# Altium PCB IoT_Speaker-PCB-v2.1.PcbDoc (part 3 of 3)
Units mm, origin at the board's own origin, x right, y up, seen from the top; angles counter-clockwise.
Board outline 61.96 x 67.79 mm, 2 copper layers (Top Layer, Bottom Layer), stack 1.57 mm thick; 110 components, 59 nets, 362 pads, 125 vias.
Unrouted connection lines stored in the file: 99.
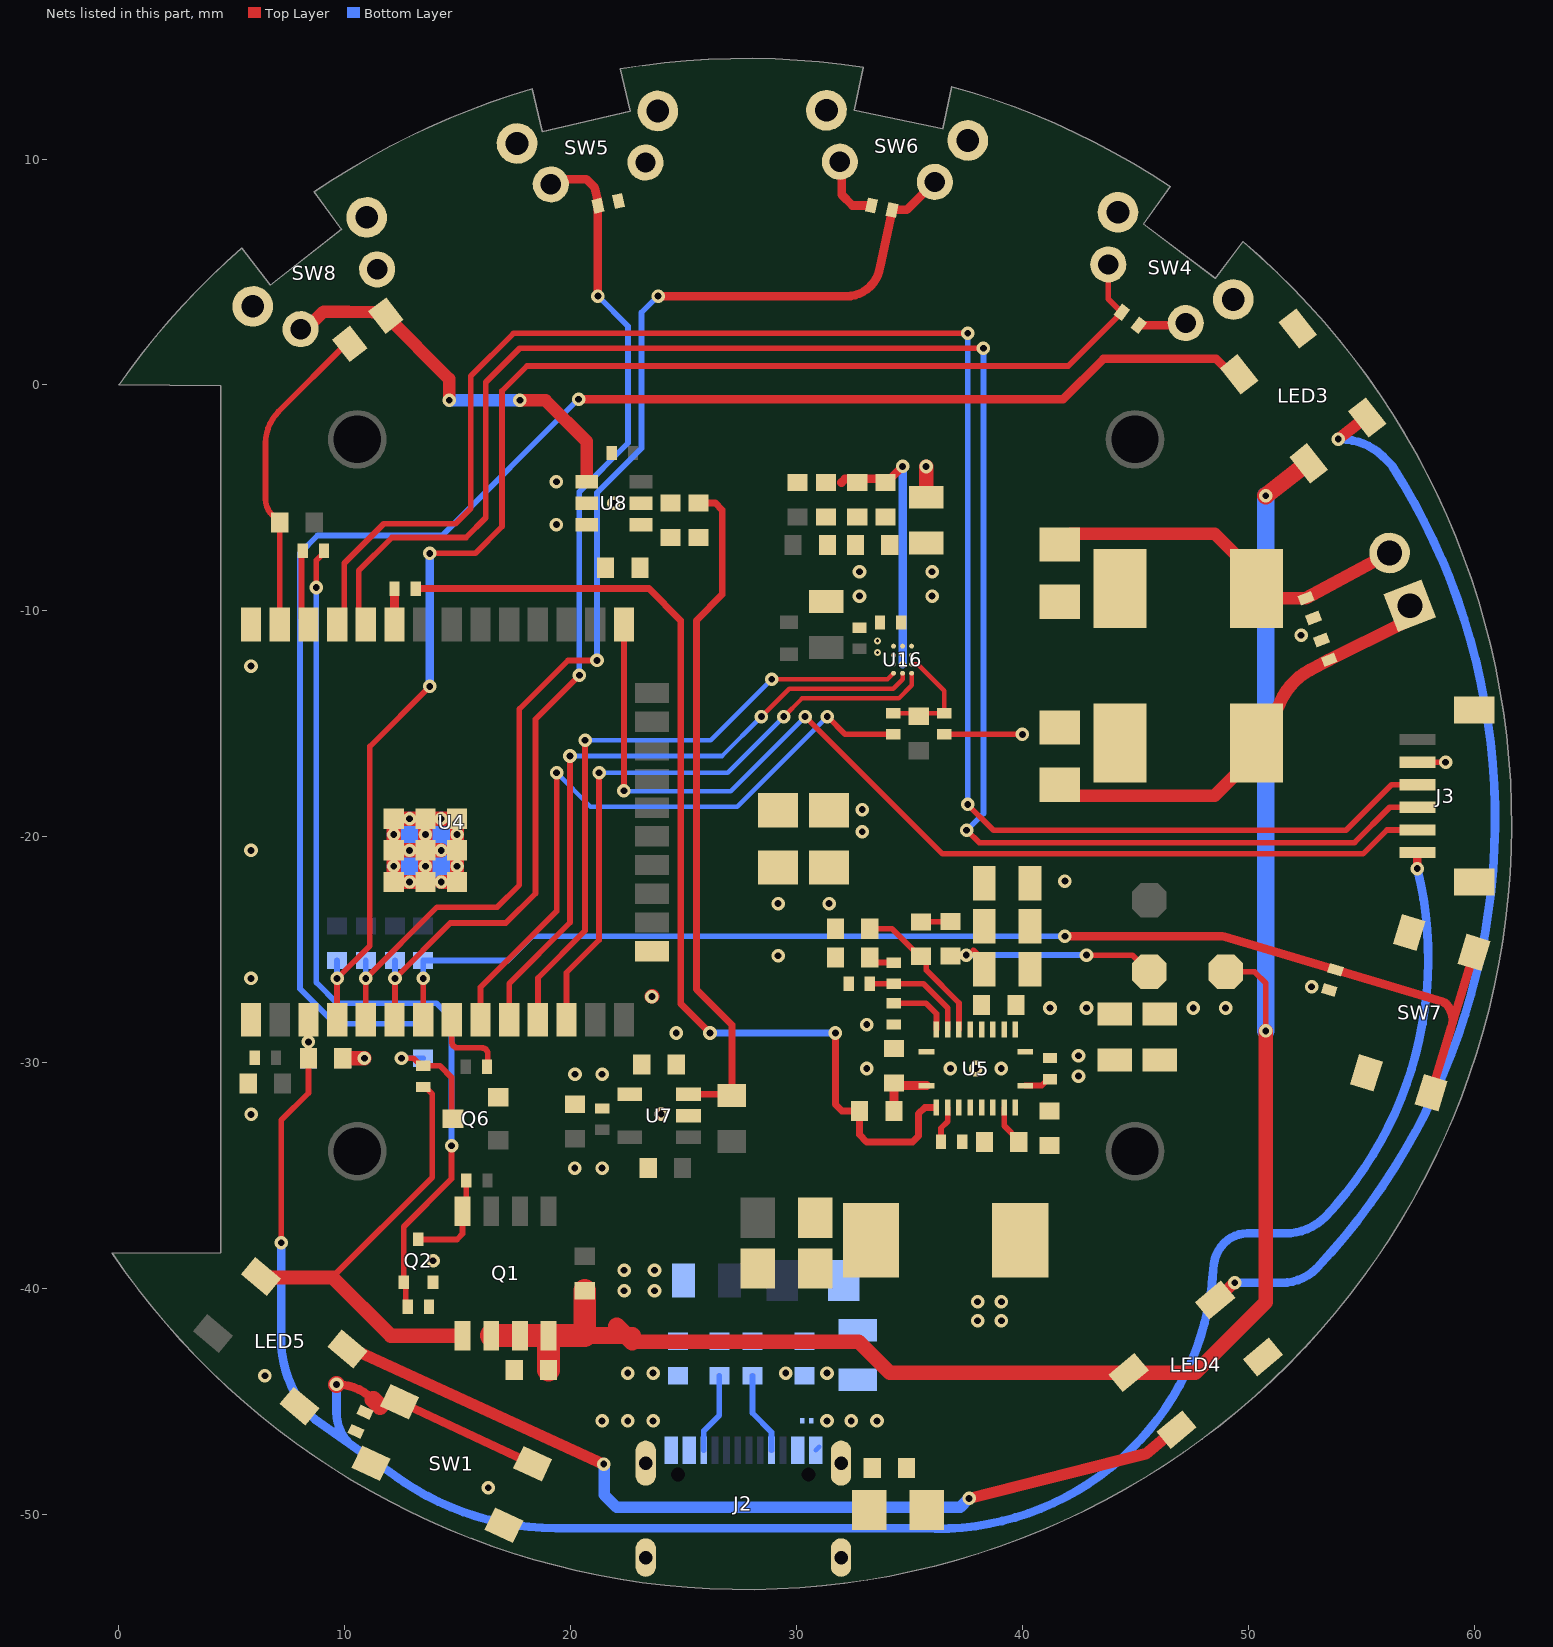
[diagram p2: the nets of this part, all layers, seen from the top]

## Via types
v1: diameter 0.6, hole 0.3, Top Layer to Bottom Layer, tented both sides, 122 vias
v2: diameter 0.3, hole 0.15, Top Layer to Bottom Layer, tented both sides, 3 vias

## Nets (pads, with @x,y where several pads share a name; then routed paths per layer and width w, separated by ;. In a path a pad name is that pad's centre, name@x,y a point inside that pad or via, vN(x,y) a via of type N, cw(c..) or ccw(c..) an arc to the next point about the centre after c; other vN are vias at no path point) (continued)
5V0: C8.2 LED3.1 LED4.1 LED5.1 Q1.5 Q1.6 Q1.7 Q1.8 R12.2 R16.2 R27.2 TP3.1 | length 103.7
  Top Layer w0.254: 9.449,-39.507 13.873,-35.083 13.873,-31.397 13.56,-31.084 R27.2@13.471,-31.084 ; TP3.1@48.489,-25.984 50.284,-25.984 50.775,-26.475 v1(50.775,-28.6)
  Top Layer w0.635: LED5.1@6.334,-39.516 9.459,-39.516 12.031,-42.088 Q1.5@15.215,-42.088 ; 22.727,-42.357 32.763,-42.357 34.133,-43.727 LED4.1@44.625,-43.727 ; LED4.1@44.707,-43.727 47.654,-43.727 50.775,-40.607 v1(50.775,-28.6)
  Top Layer w0.762: 20.625,-42.088 22.727,-42.088 ; 22.044,-41.674 22.727,-42.357 ; v1(50.775,-4.902) 52.554,-3.512 LED3.1@52.672,-3.47
  Top Layer w1.016: Q1.6@16.485,-42.088 Q1.7@17.755,-42.088 Q1.8@19.025,-42.088 ; C8.2@19.025,-43.605 Q1.8@19.025,-42.088 ; R12.2@20.625,-40.1 20.625,-42.088 Q1.8@19.025,-42.088
  Bottom Layer w0.762: v1(50.775,-28.6) v1(50.775,-4.902)
5V0_ENABLE: Q2.1 R9.2 R25.2 | length 39.7
  Top Layer w0.254: v1@8.742,-9.082 8.742,-7.764 9.076,-7.429 R25.2@9.076,-7.341 ; R9.2@12.789,-40.811 12.704,-40.726 12.704,-39.824 Q2.1@12.609,-39.729 12.609,-37.269 14.729,-35.148 v1(14.729,-33.678)
  Bottom Layer w0.254: v1(8.742,-8.966) 8.742,-26.458 9.653,-27.369 14.062,-27.369 14.729,-28.037 v1(14.729,-33.678)
12V: C1.2 C2.2 C25.2 C26.2 C34.2 C36.2 C37.2 C38.2 R7.2 TP4.1 U5.14 U5.15 U5.16 U16.B1 U16.C1 | length 9.4
  Top Layer w0.254: 37.823,-25.027 38.314,-25.517 C36.2@38.314,-25.771 ; v1(42.841,-25.24) 42.849,-25.248 44.882,-25.248 TP4.1@45.618,-25.984
  Bottom Layer w0.254: v1(37.516,-25.24) v1(42.841,-25.24)
  other v1: 32.911,-19.782 32.911,-18.8 36.005,-9.347 36.005,-8.264
AMP_EN: R13.1 U4.9 | length 29.8
  Top Layer w0.254: U4.9@16.011,-28.106 16.011,-26.668 19.38,-23.299 v1(19.38,-17.171) ; v1(31.36,-14.682) 31.374,-14.682 32.16,-15.469 R13.1@34.283,-15.469
  Bottom Layer w0.203: v1(19.38,-17.171) 20.878,-18.669 27.373,-18.669 v1(31.36,-14.682)
BCLK: U4.12 U16.A4 | length 27.5
  Top Layer w0.203: v1(29.439,-14.682) 30.242,-13.879 34.52,-13.879 35.096,-13.302 U16.A4@35.096,-12.763
  Top Layer w0.254: U4.12@19.821,-28.106 19.821,-26.018 21.26,-24.579 v1(21.26,-17.171)
  Bottom Layer w0.203: v1(21.26,-17.171) 26.95,-17.171 v1(29.439,-14.682)
BOOST_EN: R4.1 R31.2 U5.2 | length 46.8
  Top Layer w0.305: R31.2@13.144,-9.017 23.467,-9.017 24.873,-10.424 24.873,-27.393 v1(26.17,-28.69) ; v1(31.722,-28.69) 31.722,-31.864 32.006,-32.147 R4.1@32.792,-32.147 32.792,-33.195 33.11,-33.512 35.145,-33.512 35.407,-33.25 35.407,-32.266 35.679,-31.994 U5.2@36.157,-31.994
  Bottom Layer w0.305: v1(26.17,-28.69) v1(31.722,-28.69)
BUTTON_1: C19.2 R19.1 SW4.2 U4.4 | length 64.1
  Top Layer w0.254: U4.4@9.661,-28.106 v1(9.661,-26.276) 11.111,-24.826 11.111,-16 v1(13.767,-13.344) ; v1(13.767,-7.455) 15.773,-7.455 16.965,-6.263 16.965,-0.261 18.068,0.842 42.033,0.842 C19.2@44.404,3.213 43.804,3.814 SW4.2@43.804,5.336
  Bottom Layer w0.254: v1(9.661,-26.276) R19.1@9.661,-25.476
  Bottom Layer w0.381: v1(13.767,-13.344) v1(13.767,-7.455)
BUTTON_2: C21.2 R20.1 SW6.1 U4.5 | length 56
  Top Layer w0.254: U4.5@10.931,-28.106 v1(10.931,-26.276) 14.088,-23.118 16.747,-23.118 17.731,-22.135 17.731,-14.349 19.884,-12.196 v1(21.167,-12.196)
  Top Layer w0.381: v1(23.87,3.937) 32.002,3.937 ccw(c32.194,5.449) 33.706,5.258 ; 33.705,5.258 34.208,7.627 C21.2@34.236,7.751 34.885,7.751 SW6.1@36.124,8.991
  Bottom Layer w0.254: v1(10.931,-26.276) R20.1@10.931,-25.476 ; v1(21.167,-12.196) 21.167,-4.773 23.137,-2.803 23.137,3.205 v1(23.87,3.937)
BUTTON_3: C24.2 R21.1 SW5.2 U4.6 | length 46.1
  Top Layer w0.254: U4.6@12.201,-28.106 12.223,-28.084 v1@12.223,-26.323 ; v1(12.223,-26.276) 14.674,-23.825 17.129,-23.825 18.44,-22.514 18.44,-14.799 v1(20.387,-12.852)
  Top Layer w0.381: SW5.2@19.122,8.882 19.355,9.115 20.695,9.115 21.073,8.737 21.216,8.066 C24.2@21.207,7.934 v1(21.207,3.937)
  Bottom Layer w0.254: v1(12.223,-26.276) R21.1@12.223,-25.476 ; v1(20.387,-12.852) 20.387,-4.729 22.545,-2.571 22.545,2.6 v1(21.207,3.937)
BUTTON_4: C22.2 R22.1 SW7.3 SW7.4 U4.7 | length 56
  Top Layer w0.254: U4.7@13.471,-28.106 v1(13.471,-26.276)
  Top Layer w0.381: v1(41.885,-24.409) 48.856,-24.409 48.965,-24.425 C22.2@53.865,-25.892 58.61,-27.311 cw(c58.501,-27.676) 58.798,-27.438 cw(c57.885,-28.17) 59.053,-28.093 cw(c57.885,-28.17) 59.055,-28.208 ; SW7.4@58.099,-31.335 58.247,-30.848 58.962,-28.511 58.977,-28.461 59.044,-28.244 ; 59.091,-28.09 59.85,-25.607 SW7.3@59.999,-25.119
  Bottom Layer w0.254: v1(13.471,-26.276) R22.1@13.471,-25.476 17.219,-25.476 18.286,-24.409 v1(41.885,-24.409)
DATA_IN: U4.10 U16.B4 | length 29.2
  Top Layer w0.203: v1(28.448,-14.682) 29.687,-13.443 34.289,-13.443 34.696,-13.036 U16.B4@34.696,-12.792
  Top Layer w0.254: U4.10@17.281,-28.106 17.281,-26.495 19.973,-23.802 v1(19.973,-16.426)
  Bottom Layer w0.203: v1(19.973,-16.426) 26.704,-16.426 v1(28.448,-14.682)
DIN: Q6.2 R26.1 U4.8 | length 3.5
  Top Layer w0.254: U4.8@14.741,-28.106 14.741,-29.088 ccw(c15.003,-29.088) 15.003,-29.35 16.073,-29.35 cw(c16.073,-29.608) 16.332,-29.608 16.332,-30.144 cw(c16.296,-30.144) R26.1@16.296,-30.18
DIN#: LED3.4 R28.2 | length 70.8
  Top Layer w0.381: v1(20.353,-0.627) 41.805,-0.627 43.587,1.156 48.587,1.156 49.273,0.47 LED3.4@49.593,0.47
  Bottom Layer w0.254: R28.2@13.471,-28.284 9.568,-28.284 8.014,-26.73 8.014,-7.446 8.795,-6.665 14.315,-6.665 v1(20.353,-0.627)
DOUT1: LED3.2 LED4.4 | length 47.8
  Top Layer w0.508: LED4.4@48.537,-40.513 48.612,-40.513 49.374,-39.751 v1(49.399,-39.751) ; v1(53.984,-2.395) 55.054,-1.559 LED3.2@55.272,-1.438
  Bottom Layer w0.381: v1(49.399,-39.751) 51.482,-39.751 51.484,-39.751 ccw(c51.484,-37.566) 53.029,-39.111 53.033,-39.106 ccw(c31.87,-19.191) 56.382,-3.583 55.967,-3.167 55.965,-3.165 ccw(c54.155,-4.976) 54.353,-2.423 v1(53.984,-2.395) v1@53.995,-2.421
DOUT2: LED4.2 LED5.4 | length 40.2
  Top Layer w0.508: LED5.4@10.12,-42.686 10.658,-42.816 v1(21.463,-47.777) ; v1(37.643,-49.295) 45.463,-47.322 46.41,-46.528 LED4.2@46.828,-46.255
  Bottom Layer w0.508: v1(21.463,-47.777) 21.481,-47.795 21.481,-49.138 22.034,-49.692 37.246,-49.692 v1(37.643,-49.295)
EN_IN: R13.2 R14.2 R32.1 U16.A3 | length 5.2
  Top Layer w0.203: R13.2@34.283,-14.529 R14.2@36.544,-14.529 36.544,-13.54 35.363,-12.359 35.11,-12.359 35.108,-12.361 35.102,-12.361 U16.A3@35.101,-12.359
ENA: C14.2 C15.2 J3.6 R18.1 SW1.3 SW1.4 U4.3 | length 101.1
  Top Layer w0.254: v1(7.183,-37.973) 7.183,-32.553 8.391,-31.345 C14.2@8.391,-29.808 8.391,-29.656 U4.3@8.391,-28.106
  Top Layer w0.381: v1@9.635,-44.248 cw(c9.634,-46.547) 11.259,-44.921 ; SW1.4@12.427,-45.02 SW1.3@18.319,-47.767 ; v1(57.487,-21.413) J3.6@57.487,-20.698
  Top Layer w0.762: 11.259,-44.921 11.561,-45.223 ; SW1.4@12.399,-44.992 SW1.4@12.427,-45.02
  Bottom Layer w0.381: v1(7.183,-37.973) 7.183,-42.243 7.183,-42.244 ccw(c12.143,-42.244) 8.658,-45.774 ccw(c8.925,-45.502) 8.704,-45.813 8.705,-45.813 10.202,-46.869 ; v1(9.634,-44.248) 9.634,-45.497 ccw(c11.574,-45.497) 10.202,-46.869 ; 10.71,-47.227 10.508,-47.084 ; v1(57.487,-21.413) cw(c41.311,-25.388) 53.425,-36.822 cw(c51.629,-35.026) 51.629,-37.566 49.95,-37.566 ccw(c49.95,-38.984) 48.946,-37.982 ccw(c50.145,-39.179) 48.451,-39.162 48.45,-39.171 cw(c36.225,-38.391) 35.55,-50.623 35.408,-50.615 19.34,-50.615 19.339,-50.615 cw(c19.334,-38.561) 12.596,-48.556 12.389,-48.411 12.182,-48.265 10.508,-47.084 ; 10.202,-46.869 10.508,-47.084
  other v1: 8.391,-29.084
ENABLE: R10.2 R11.1 U7.3 | length 29.9
  Top Layer w0.305: U7.3@25.215,-31.404 R11.1@27.139,-31.404 ; R10.2@25.924,-5.223 26.408,-5.223 26.712,-5.527 26.712,-9.281 25.566,-10.427 25.566,-26.755 27.139,-28.327 R11.1@27.139,-31.404 ; R11.1@27.139,-31.465 R11.1@27.139,-31.404
GAIN: R36.1 R37.1 R38.1 R39.1 U16.B3 | length 11.8
  Top Layer w0.381: 31.995,-4.318 32.148,-4.164 32.669,-4.164 32.69,-4.143 R39.1@33.985,-4.143 ; R39.1@33.985,-4.318 v1(34.696,-3.607)
  Bottom Layer w0.381: v2(34.696,-12.363) v1(34.696,-3.607)
GND: C1.1 C2.1 C4.2 C5.1 C8.1 C9.1 C10.1 C11.2 C12.2 C14.1 C15.1 C17.1 C19.1 C21.1 C22.1 C23.1 C24.1 C25.1 C26.1 C27.1 C28.1 C30.1 C31.2 C32.1 C34.1 C35.2 C36.1 C37.1 C38.1 C75.1 C76.1 C77.1 C78.1 C79.1 C102.1 C103.1 D1.2 J2.A1/B12 J2.B1/A12 J3.2 J3.MP1 J3.MP2 LED3.3 LED4.3 LED5.3 Q2.2 R1.2 R2.2 R5.2 R9.1 R14.1 R34.2 R35.2 R36.2 R66.2 R69.1 SW1.1 SW1.2 SW4.1 SW4.SH1 SW4.SH2 SW5.1 SW5.SH1 SW5.SH2 SW6.2 SW6.SH1 SW6.SH2 SW7.1 SW7.2 SW8.1 SW8.SH1 SW8.SH2 U4.1 U4.15 U4.38 U4.39 U4.39_16 U4.40 U4.41 U4.42 U4.43 U4.44 U4.45 U4.46 U4.47 U5.11 U5.12 U5.13 U5.20 U5.21 U7.2 U8.2 U8.3 U16.B2 U16.C2 | length 39
  Top Layer w0.254: R14.1@36.544,-15.469 v1(40.005,-15.469) ; J3.2@57.487,-16.698 v1(58.74,-16.698)
  Top Layer w0.381: SW6.2@31.918,9.885 32.002,9.8 32.002,8.421 32.476,7.947 C21.1@33.316,7.947 ; C19.1@45.153,2.646 47.137,2.646 SW4.1@47.233,2.742
  Top Layer w0.635: C14.1@9.915,-29.808 v1(10.871,-29.808) ; U4.39_16@14.271,-22.006 U4.45@14.971,-22.006 U4.47@14.971,-19.206 U4.44@13.571,-19.206 ; U4.39_16@14.271,-20.606 U4.43@13.571,-20.606 ; v1(23.597,-27.076) v1@23.611,-27.062 ; C2.1@35.738,-4.971 v1(35.738,-3.609) ; U4.40@12.171,-20.606 U4.43@13.571,-20.606 ; U4.40@12.171,-20.606 U4.41@12.171,-19.206 U4.44@13.571,-19.206 ; U4.40@12.171,-20.606 U4.39@12.171,-22.006 U4.42@13.571,-22.006 U4.43@13.571,-20.606 ; U4.43@13.571,-20.606 U4.44@13.571,-19.206
  Bottom Layer w0.203: J2.A1/B12@30.848,-47.166 J2.A1/B12@31,-47.013
  Bottom Layer w0.635: U4.39_16@12.171,-21.306 12.871,-21.306 ; U4.39_16@12.171,-19.906 12.871,-19.906 ; U4.39_16@12.871,-22.006 12.871,-21.306 ; U4.39_16@12.871,-19.206 12.871,-19.906 ; U4.39_16@14.271,-22.006 14.271,-21.306 14.271,-19.906 ; U4.39_16@14.271,-19.206 14.271,-19.906 ; U4.39_16@14.971,-21.306 12.871,-21.306 ; U4.39_16@14.971,-19.906 14.271,-19.906 ; 12.871,-21.306 12.871,-19.906 ; 12.871,-19.906 14.271,-19.906
  other v1: 16.354,-48.827 21.39,-45.864 22.532,-45.864 23.653,-45.864 31.35,-45.864 32.423,-45.864 33.565,-45.864 6.466,-43.865 22.365,-40.1 23.714,-40.1 22.365,-39.195 23.714,-39.195 13.909,-38.779 20.18,-34.671 21.392,-34.671 5.851,-32.297 24.016,-32.278 20.193,-30.519 21.392,-30.519 33.11,-30.262 36.816,-30.262 37.942,-30.267 39.068,-30.262 24.677,-28.69 33.11,-28.316 41.224,-27.584 42.841,-27.584 47.57,-27.584 48.997,-27.584 52.803,-26.639 5.849,-26.276 29.186,-25.273 29.186,-22.959 31.443,-22.959 41.885,-21.966 5.849,-20.606 5.849,-12.446 52.339,-11.085 32.789,-9.347 32.789,-8.264 19.371,-6.182 21.914,-5.232 19.371,-4.282
  other v2: 33.585,-11.846 33.585,-11.33
IO0: J3.5 U4.25 | length 46.8
  Top Layer w0.254: v1(22.361,-17.966) U4.25@22.361,-10.606 ; v1(30.383,-14.682) 36.459,-20.759 55.081,-20.759 56.141,-19.698 J3.5@57.487,-19.698
  Bottom Layer w0.203: v1(22.361,-17.966) 22.377,-17.983 27.082,-17.983 v1(30.383,-14.682)
LRCLK: U4.11 U16.C4 | length 28.1
  Top Layer w0.203: v1(28.905,-13.03) 34.03,-13.03 U16.C4@34.296,-12.763
  Top Layer w0.254: U4.11@18.551,-28.106 18.551,-26.254 20.641,-24.164 v1(20.641,-15.726)
  Bottom Layer w0.203: v1@20.641,-15.73 26.205,-15.73 v1(28.905,-13.03)
NetC10_2: C10.2 J9.2 L2.2 R15.2 | length 16.8
  Top Layer w0.559: R15.2@41.656,-7.061 42.138,-6.579 48.508,-6.579 50.371,-8.442 L2.2@50.371,-9.017 50.792,-9.439 C10.2@52.55,-9.439 J9.2@56.261,-7.439
NetC11_1: C11.1 J9.1 L3.2 R23.2 | length 18.4
  Top Layer w0.559: R23.2@41.656,-17.704 42.138,-18.185 48.508,-18.185 L3.2@50.371,-16.323 ; L3.2@50.976,-15.244 51.266,-14.379 51.413,-14.044 cw(c54.116,-15.23) 52.738,-12.62 C11.1@53.589,-12.17 56.8,-10.575 J9.1@57.157,-9.773
NetC27_2: C27.2 C28.2 C30.2 L1.1 R16.1 R24.1 U5.9
  other v1: 38.018,-41.427 39.071,-41.427 38.018,-40.591 39.071,-40.591 42.485,-30.6 42.485,-29.7
NetC29_1: C29.1 L1.2 R33.1 U5.4 U5.5 U5.6 U5.7
NetC29_2: C29.2 U5.8 | length 1.8
  Top Layer w0.254: U5.8@39.194,-31.994 39.194,-32.801 39.842,-33.449 C29.2@39.842,-33.512
NetC31_1: C31.1 R4.2 U5.1 | length 2.7
  Top Layer w0.381: C31.1@34.255,-31.017 U5.1@35.757,-31.017 ; C31.1@34.313,-30.901 34.316,-30.905 R4.2@34.316,-32.147
NetC32_2: C32.2 U5.10 | length 1.2
  Top Layer w0.254: U5.10@40.127,-31.017 40.858,-31.017 41.033,-30.842 41.033,-30.838 41.135,-30.737 C32.2@41.224,-30.737
NetC33_1: C33.1 C35.1 U5.18 | length 4.8
  Top Layer w0.254: C35.1@33.246,-26.513 C33.1@34.308,-26.513 35.626,-26.513 36.694,-27.581 U5.18@36.694,-28.539
NetC33_2: C33.2 R35.1 | length 1.2
  Top Layer w0.254: R35.1@33.246,-25.345 33.475,-25.573 C33.2@34.308,-25.573
NetC76_2: C76.2 U7.4
NetC79_2: C79.2 J2.S1 J2.S2 J2.S3 J2.S4 R69.2
NetF1_2: F1.2 FB7.1
NetJ2_A5: J2.A5 R1.1 | length 3.7
  Bottom Layer w0.254: R1.1@28.048,-43.865 28.048,-45.52 28.898,-46.37 J2.A5@28.898,-47.166
NetJ2_B5: J2.B5 R2.1 | length 3.6
  Bottom Layer w0.254: J2.B5@25.898,-47.166 25.898,-46.306 26.585,-45.619 R2.1@26.585,-43.865
NetQ1_4: Q1.4 Q2.3 R8.1 | length 4.5
  Top Layer w0.254: Q2.3@13.259,-37.829 14.964,-37.829 15.215,-37.578 Q1.4@15.215,-36.588 15.38,-36.423 R8.1@15.38,-35.223
NetQ6_3: Q6.3 R27.1 R28.1 | length 5.4
  Top Layer w0.254: v1(12.511,-29.808) 13.046,-29.808 13.382,-30.144 14.211,-30.144 14.741,-30.673 14.741,-32.433 ccw(c14.795,-32.433) Q6.3@14.795,-32.488
  Bottom Layer w0.254: v1(12.511,-29.808) R28.1@13.471,-29.808
NetR3_2: R3.2 SW8.2 U8.1 | length 17.8
  Top Layer w0.559: SW8.2@8.045,2.472 SW8.2@8.159,2.472 ; SW8.2@8.318,2.472 SW8.2@8.159,2.472 ; v1(14.621,-0.678) 14.621,0.271 R3.2@11.82,3.073 11.421,3.212 11.248,3.217 10.143,3.247 9.067,3.247 8.292,2.472 SW8.2@8.159,2.472 ; v1(17.755,-0.678) 18.89,-0.678 20.714,-2.502 U8.1@20.714,-4.282
  Bottom Layer w0.559: v1(14.621,-0.678) v1(17.755,-0.678)
NetR5_1: R5.1 R6.1 U5.17 | length 6.7
  Top Layer w0.254: R5.1@33.246,-24.075 34.224,-24.075 R6.1@35.443,-25.294 ; R6.1@35.57,-25.294 R6.1@35.507,-25.294 35.743,-25.53 35.743,-25.907 37.194,-27.358 U5.17@37.194,-28.539
NetR6_2: R6.2 R7.1 | length 1.3
  Top Layer w0.254: R6.2@35.507,-23.77 R7.1@36.803,-23.77 ; R7.1@36.803,-23.516 R7.1@36.816,-23.503
NetR10_1: R10.1 R29.2 R30.2
NetR25_1: R25.1 U4.36 | length 3.4
  Top Layer w0.254: R25.1@8.137,-7.341 8.085,-7.392 8.085,-10.3 U4.36@8.391,-10.606
NetR29_1: R29.1 U8.4
NetR30_1: R30.1 U8.5
NetR31_1: R31.1 U4.33 | length 1.6
  Top Layer w0.381: U4.33@12.201,-10.606 R31.1@12.201,-9.017
NetR33_2: R33.2 U5.3 | length 1.6
  Top Layer w0.254: R33.2@36.397,-33.512 36.397,-32.903 36.694,-32.606 U5.3@36.694,-31.994
NetR34_1: R34.1 U5.19 | length 2.8
  Top Layer w0.254: R34.1@34.313,-27.377 35.732,-27.377 36.194,-27.839 U5.19@36.194,-28.539
NetR38_2: R38.2 R67.1
NetR39_2: R39.2 R66.1
PA_OUT+: L2.1 R15.1 U16.A1
PA_OUT-: L3.1 R23.1 U16.A2
PWR_SW: R3.1 R17.1 U4.37 | length 14.2
  Top Layer w0.254: U4.37@7.121,-10.606 R17.1@7.121,-6.095 6.788,-5.762 cw(c7.501,-5.049) 6.609,-5.52 cw(c7.501,-5.049) 6.492,-5.049 6.492,-2.571 cw(c8.463,-2.571) 7.069,-1.178 10.069,1.822 R3.1@10.218,1.822
RXD: J3.4 U4.34 | length 80.3
  Top Layer w0.254: U4.34@10.931,-10.606 10.615,-10.291 10.615,-8.219 12.085,-6.749 15.374,-6.749 16.24,-5.882 16.24,0.12 17.746,1.626 v1(38.278,1.626) ; v1(37.53,-19.719) 37.547,-19.719 38.09,-20.262 54.701,-20.262 56.265,-18.698 J3.4@57.487,-18.698
  Bottom Layer w0.254: v1(37.53,-19.719) 38.278,-18.971 v1(38.278,1.626)
TXD: J3.3 U4.35 | length 80.2
  Top Layer w0.254: U4.35@9.661,-10.606 9.977,-10.29 9.977,-7.895 11.724,-6.148 14.898,-6.148 15.58,-5.465 15.58,0.394 17.472,2.286 v1(37.578,2.286) ; v1(37.578,-18.569) 38.724,-19.715 54.324,-19.715 56.34,-17.698 J3.3@57.487,-17.698
  Bottom Layer w0.254: v1(37.578,-18.569) v1(37.578,2.286)
VUSB: C4.1 C12.1 D1.1 F1.1 J2.A4/B9 J2.B4/A9
  other v1: 22.532,-43.746 23.653,-43.746 29.522,-43.746 31.35,-43.746
pads on no net: J2.A6 J2.A7 J2.A8 J2.B6 J2.B7 J2.B8 J2.MH LED5.2 U4.13 U4.14 U4.16 U4.17 U4.18 U4.19 U4.20 U4.21 U4.22 U4.23 U4.24 U4.26 U4.27 U4.28 U4.29 U4.30 U4.31 U4.32

## Polygon pours and split planes (outlines as drawn)
NetC27_2 on Top Layer "NONET_L-01_P-001" (solid, pour order 15): 41.917,-29.239 41.917,-30.894 41.225,-31.586 39.571,-31.586 39.571,-32.563 41.815,-32.563 43.674,-30.705 46.838,-30.705 46.838,-29.239
GND on Top Layer "NONET_L-01_P-001" (solid, remove dead copper, pour order 12): -0.298,-38.441 4.499,-38.429 4.499,-0.027 0,0 cw(c27.739,-19.413) 5.433,6.058 6.706,4.429 9.858,6.892 8.648,8.55 cw(c27.759,-19.414) 18.3,13.109 18.735,11.222 22.633,12.122 22.2,13.998 cw(c27.772,-19.406) 32.959,14.06 32.557,12.169 36.47,11.337 36.869,13.215 cw(c27.781,-19.417) 46.551,8.781 45.364,7.124 48.542,4.721 49.772,6.348 cw(c27.771,-19.438) 32.118,-53.055 cw(c27.771,-19.438) 23.178,-53.022 cw(c27.771,-19.438)
12V on Top Layer "NONET_L-01_P-001" (solid, pour order 4): 36.134,-21.204 32.684,-17.755 28.297,-17.755 28.297,-19.971 32.23,-19.971 34.988,-22.728 38.822,-22.728 38.822,-21.204
12V on Top Layer "NONET_L-01_P-001" (solid, pour order 2): 34.976,-6.495 34.976,-8.972 34.159,-9.789 34.159,-11.675 34.845,-11.675 34.845,-11.071 36.669,-9.247 36.669,-6.495
NetC27_2 on Top Layer "NONET_L-01_P-001" (solid, pour order 9): 39.573,-41.834 39.573,-40.208 35.56,-40.208 35.56,-34.569 30.065,-34.569 30.065,-37.863 34.036,-41.834
3.3V_AMP on Top Layer "NONET_L-01_P-001" (solid, pour order 7): 29.139,-11.283 28.956,-11.1 28.956,-7.724 29.151,-7.529 30.493,-7.529 30.493,-5.461 28.55,-5.461 28.118,-5.893 28.118,-12.116 28.51,-12.509 34.475,-12.509 34.475,-12.232 33.278,-12.232 33.106,-12.06 33.106,-11.283 32.249,-11.283 32.078,-11.112 30.554,-11.112 30.383,-11.283
PA_OUT+ on Top Layer "NONET_L-01_P-001" (solid, pour order 6): 36.338,-11.681 36.691,-11.328 45.496,-11.328 45.496,-7.267 43.146,-7.267 43.146,-8.839 40.767,-8.839 40.767,-10.497 36.482,-10.497 35.528,-11.451 34.972,-11.451 34.972,-11.681
PA_OUT- on Top Layer "NONET_L-01_P-001" (solid, pour order 5): 36.338,-11.846 36.659,-12.167 45.496,-12.167 45.496,-17.6 43.146,-17.6 43.146,-15.926 40.767,-15.926 40.767,-13.03 36.482,-13.03 35.528,-12.076 34.972,-12.076 34.972,-11.846
NetC29_1 on Top Layer "NONET_L-01_P-001" (solid, pour order 3): 41.154,-39.521 41.154,-36.221 39.399,-36.221 38.928,-35.75 38.928,-31.644 37.072,-31.644 37.072,-39.521
NetC27_2 on Bottom Layer "NONET_L-01_P-001" (solid, pour order 1): 43.1,-31.066 43.1,-29.286 42.206,-29.286 37.567,-33.926 37.567,-41.834 39.522,-41.834 39.522,-34.644
GND on Bottom Layer "NONET_L-01_P-001" (solid, remove dead copper, pour order 14): -0.298,-38.441 4.499,-38.429 4.499,-0.027 0,0 cw(c27.739,-19.413) 5.433,6.058 6.706,4.429 9.858,6.892 8.648,8.55 cw(c27.759,-19.414) 18.3,13.109 18.735,11.222 22.633,12.122 22.2,13.998 cw(c27.772,-19.406) 32.959,14.06 32.557,12.169 36.47,11.337 36.869,13.215 cw(c27.781,-19.417) 46.551,8.781 45.364,7.124 48.542,4.721 49.772,6.348 cw(c27.771,-19.438) 32.118,-53.055 cw(c27.771,-19.438) 23.178,-53.022 cw(c27.771,-19.438)
12V on Bottom Layer "NONET_L-01_P-001" (solid, pour order 13): 35.295,-18.39 32.385,-18.39 32.385,-20.193 36.728,-20.193 36.728,-7.747 35.295,-7.747
VUSB on Bottom Layer "NONET_L-01_P-001" (solid, pour order 11): 21.463,-43.103 21.463,-45.339 24.321,-45.339 24.948,-45.966 24.948,-48.469 25.527,-49.048 29.904,-49.048 30.348,-48.604 30.348,-45.624 30.632,-45.339 34.392,-45.339 34.392,-43.103 29.134,-43.103 29.134,-46.566 25.548,-46.566 25.548,-45.98 25.781,-45.747 25.781,-43.103

## Other copper
Top Layer:
  rectangle net ENA: 8.01,-30.253 8.772,-27.356
  rectangle net PA_OUT-: 35.005,-12.076 35.564,-11.844
  rectangle net PA_OUT+: 35.005,-11.683 35.564,-11.451
  rectangle net GND: 33.329,-12.065 34.812,-11.829
  rectangle net 3.3V: 6.671,-22.911 10.084,-21.959
  rectangle net NetR10_1: 22.691,-8.537 26.115,-7.648
  rectangle net 12V: 36.372,-25.662 38.822,-24.9
  rectangle net 5V0: 14.865,-42.738 29.224,-40.611
  rectangle net 5V0: 26.416,-42.586 29.224,-38.226
  rectangle net NetC27_2: 30.065,-40.107 35.56,-34.569
  rectangle net 3.3V: 29.267,-10.813 30.067,-8.967
  rectangle net 5V: 22.533,-4.582 23.614,-2.696
  rectangle net GAIN: 29.604,-4.699 34.386,-3.937
  rectangle net NetR39_2: 33.497,-7.524 34.514,-5.461
  rectangle net NetR38_2: 30.855,-7.529 31.754,-5.461
  rectangle net NetC76_2: 22.065,-31.704 23.534,-29.637
  rectangle net 5V: 24.296,-37.946 27.774,-33.004
  rectangle net 3.3V: 16.335,-33.848 23.534,-32.595
  rectangle net 12V: 37.572,-28.889 38.833,-21.204
  rectangle net 5V: 20.18,-38.957 21.069,-35.938
  rectangle net 5V: 16.091,-37.946 29.224,-35.913
  rectangle net 5V: 16.091,-37.238 16.835,-34.906
  region net NetC79_2: 22.795,-46.863 22.795,-47.736 32.423,-47.736 32.423,-46.863
  region net NetC79_2: 22.873,-51.542 22.873,-52.634 32.423,-52.634 32.423,-51.542
  rectangle net NetC79_2: 22.795,-52.603 23.887,-46.863
  rectangle net NetC79_2: 31.445,-52.316 34.112,-46.868
  rectangle net DIN: 16.049,-31.948 17.537,-31.006
  rectangle net DIN: 16.023,-31.948 16.744,-29.863
  region net GND: 53.896,-27.379 54.124,-26.632 52.502,-26.136 52.273,-26.883
  region net GND: 21.214,-4.932 20.214,-4.932 20.214,-6.482 21.214,-6.482
  region net NetR29_1: 22.31,-5.882 21.79,-5.882 21.79,-8.537 22.31,-8.537
  region net NetR29_1: 22.31,-6.746 21.167,-6.746 21.167,-8.537 22.31,-8.537
  region net NetR29_1: 23.614,-5.882 21.79,-5.882 21.79,-7.43 23.614,-7.43
  region net NetR10_1: 26.115,-6.365 23.974,-6.365 23.974,-8.537 26.115,-8.537
  region net NetR30_1: 24.863,-4.841 22.614,-4.841 22.614,-5.603 24.863,-5.603
  region net ENA: 10.487,-45.578 12.502,-46.518 13.294,-44.818 11.28,-43.878
  rectangle net 3.3V: 6.671,-31.37 7.627,-21.959
  rectangle net VUSB: 20.625,-45.314 32.461,-43.131
  pour cut-out: 40.602,-7.315 40.602,-8.839 45.496,-8.839 45.496,-17.6 43.146,-17.6 43.146,-15.926 40.602,-15.926 40.602,-17.45 42.545,-17.45 42.545,-18.212 47.855,-18.212 49.104,-16.964 49.104,-13.999 51.673,-13.999 51.673,-10.911 49.051,-10.911 49.043,-10.919 49.043,-7.737 47.892,-6.586 42.697,-6.586 42.697,-7.315
  pour cut-out: 7.454,-2.408 ccw(c10.554,-2.408) 10.554,-5.508 ccw(c10.554,-2.408) 13.654,-2.408 ccw(c10.554,-2.408) 10.554,0.692 ccw(c10.554,-2.408)
  pour cut-out: 41.887,-2.408 ccw(c44.987,-2.408) 44.987,-5.508 ccw(c44.987,-2.408) 48.087,-2.408 ccw(c44.987,-2.408) 44.987,0.692 ccw(c44.987,-2.408)
  pour cut-out: 41.887,-33.921 ccw(c44.987,-33.921) 44.987,-37.021 ccw(c44.987,-33.921) 48.087,-33.921 ccw(c44.987,-33.921) 44.987,-30.821 ccw(c44.987,-33.921)
  pour cut-out: 7.455,-33.921 ccw(c10.555,-33.921) 10.555,-37.021 ccw(c10.555,-33.921) 13.655,-33.921 ccw(c10.555,-33.921) 10.555,-30.821 ccw(c10.555,-33.921)
  pour cut-out: 48.349,-38.71 50.337,-38.71 50.337,-39.176 48.815,-39.176
  pour cut-out: 30.065,-34.42 28.925,-34.42 28.925,-35.913 30.065,-35.913
  pour cut-out: 35.56,-32.344 37.072,-32.344 37.072,-40.208 35.56,-40.208
  pour cut-out: 34.551,-3.791 27.769,-3.791 27.769,-5.461 34.551,-5.461
  pour cut-out: 29.182,-12.509 26.812,-12.509 26.812,-14.682 29.182,-14.682
  pour cut-out: 36.671,-9.245 36.671,-10.308 36.005,-10.974 36.005,-9.911
Bottom Layer:
  rectangle net ENA: 8.01,-30.253 8.772,-28.783
  rectangle net 3.3V: 9.216,-24.333 13.915,-23.571
  rectangle net 3.3V: 9.216,-24.333 10.105,-22.015
  rectangle net 3.3V: 17.485,-33.936 19.508,-32.976
  rectangle net 5V: 24.003,-38.202 30.734,-35.001
  rectangle net 5V: 26.014,-40.559 30.734,-35.001
  rectangle net NetF1_2: 31.394,-42.344 34.392,-35.001
  pour cut-out: 25.781,-42.954 29.134,-42.954 29.134,-44.399 25.807,-44.399 25.781,-44.425
  pour cut-out: 34.392,-42.344 34.392,-43.103 31.229,-43.103 31.229,-42.344
  pour cut-out: 30.734,-40.697 30.734,-34.856 31.394,-34.856 31.394,-40.697

## Silkscreen, mask and mechanical layers (free items; w line width, h text height)
Top Overlay:
  lines w0.127: 5.116,-32.937 4.783,-32.604 4.783,-29.746 5.646,-29.741 ; 37.836,-34.046 37.836,-34.326 41.733,-34.326 ; 41.733,-39.546 41.733,-37.288 ; 41.733,-34.151 41.733,-34.326 ; 44.964,-30.548 45.431,-31.015 48.505,-31.015 48.926,-30.594 48.926,-30.177 ; 45.422,-37.599 45.422,-37.288 41.733,-37.288 ; 41.733,-37.288 41.733,-34.326
  text "MUTE" at 26.999,10.065 h1.52 r103
  text "VOL-" at 29.486,9.821 h1.52 r78
  text "VOL+" at 41.512,6.264 h1.52 r52.9
  text "ON/OFF" at 7.535,-0.66 h1.52 r128
  text "+ve" at 55.614,-4.656 h1.2 r21
  text "-ve" at 58.675,-13.086 h1.2 r21
  text "PROGRAM" at 56.478,-21.744 h1.52 r90
  text "3V3" at 44.306,-21.869 h1.2
  text "12V0" at 44.306,-25.044 h1.2
  text "5V0" at 47.685,-25.044 h1.2
  text "BUTTON4" at 54.274,-30.614 h1.52 r73
  text "RESET" at 13.637,-44.598 h1.4 r335
Bottom Overlay:
  drawing of 3075 lines, arcs and shapes, not listed
  text "ZERO CARBON FOOTPRINT" at 40.091,-24.106 h0.97
  text "USB" at 32.644,-52.538 h1.52 r270
Board Outline:
  circle w0.254: c10.554,-2.408 r1.05
  circle w0.254: c44.987,-33.921 r1.05
  circle w0.254: c44.987,-2.408 r1.05
  circle w0.254: c10.555,-33.921 r1.05
  lines w0.254: -0.298,-38.441 ccw(c27.771,-19.438) 23.178,-53.022 ccw(c27.771,-19.438) 32.118,-53.055 ccw(c27.771,-19.438) 49.772,6.348 48.542,4.721 45.364,7.124 46.551,8.781 ccw(c27.781,-19.417) 36.869,13.215 36.47,11.337 32.557,12.169 32.959,14.06 ccw(c27.772,-19.406) 22.2,13.998 22.633,12.122 18.735,11.222 18.3,13.109 ccw(c27.759,-19.414) 8.648,8.55 9.858,6.892 6.706,4.429 5.433,6.058 ccw(c27.739,-19.413) 0,0 4.499,-0.027 4.499,-38.429 -0.298,-38.441
Fabrication:
  drawing of 191 lines, arcs and shapes, not listed
  text "Layer" at 68.563,-10.592 h1.52
  text "Name" at 78.975,-10.592 h1.52
  text "Material" at 102.591,-10.592 h1.52
  text "Thickness" at 124.429,-10.592 h1.52
  text "Constant" at 140.934,-10.592 h1.52
  text "Board Layer Stack" at 155.409,-10.592 h1.52
  text "Top Overlay" at 78.975,-13.64 h1.52
  text "Top Solder" at 78.975,-16.688 h1.52
  text "Solder Resist" at 102.591,-16.688 h1.52
  text "0.39mil" at 124.429,-16.688 h1.52
  text "3.5" at 140.934,-16.688 h1.52
  text "1" at 68.563,-19.736 h1.52
  text "Top Layer" at 78.975,-19.736 h1.52
  text "1.38mil" at 124.429,-19.736 h1.52
  text "Dielectric 1" at 78.975,-22.784 h1.52
  text "FR-4" at 102.591,-22.784 h1.52
  text "59.06mil" at 124.429,-22.784 h1.52
  text "4.8" at 140.934,-22.784 h1.52
  text "2" at 68.563,-25.832 h1.52
  text "Bottom Layer" at 78.975,-25.832 h1.52
  text "1.38mil" at 124.429,-25.832 h1.52
  text "Bottom Solder" at 78.975,-28.88 h1.52
  text "Solder Resist" at 102.591,-28.88 h1.52
  text "0.39mil" at 124.429,-28.88 h1.52
  text "3.5" at 140.934,-28.88 h1.52
  text "Bottom Overlay" at 78.975,-31.928 h1.52
  text "Total board thickness:" at 68.563,-34.976 h1.52
  text "62.60mil" at 124.429,-34.976 h1.52
Drill Drawing:
  circle w0.254: c-2.041,61.373 r0.847
  circle w0.254: c-2.041,46.133 r0.508
  circle w0.254: c-2.041,46.133 r0.847
  lines w0.254: -2.888,30.047 -1.195,30.047 -1.195,31.74 -2.888,31.74 -2.888,30.047 ; -2.888,34.28 -2.465,34.28 -2.041,33.857 -1.618,34.28 -1.195,34.28 -1.618,34.703 -1.195,35.127 -1.618,35.127 -2.041,35.55 -2.465,35.127 -2.888,35.127 -2.465,34.703 -2.888,34.28 ; -2.888,39.36 -1.195,39.36 -2.041,37.667 -2.888,39.36 ; -2.888,42.323 -2.041,41.477 -1.195,42.323 -2.041,43.17 -2.888,42.323 ; -2.888,50.79 -1.195,50.79 -2.041,49.097 -2.888,50.79 ; -2.888,53.33 -2.465,53.33 -2.041,52.907 -1.618,53.33 -1.195,53.33 -1.618,53.753 -1.195,54.177 -1.618,54.177 -2.041,54.6 -2.465,54.177 -2.888,54.177 -2.465,53.753 -2.888,53.33 ; -2.888,56.717 -2.041,57.14 -1.195,56.717 -1.618,57.563 -1.195,58.41 -2.041,57.987 -2.888,58.41 -2.465,57.563 -2.888,56.717 ; -2.549,50.451 -1.533,50.451 -2.041,49.435 -2.549,50.451 ; -2.549,53.499 -2.295,53.499 -2.041,53.245 -1.787,53.499 -1.533,53.499 -1.787,53.753 -1.533,54.007 -1.787,54.007 -2.041,54.261 -2.295,54.007 -2.549,54.007 -2.295,53.753 -2.549,53.499
  lines w0.381: -4.407,28.904 246.983,28.904 ; -4.407,63.194 246.983,63.194 ; 9.586,25.094 9.586,67.004 ; 24.568,25.094 24.568,67.004 ; 52.5,25.094 52.5,67.004 ; 65.349,25.094 65.349,67.004 ; 83.987,25.094 83.987,67.004 ; 122.076,25.094 122.076,67.004 ; 137.058,25.094 137.058,67.004 ; 156.001,25.094 156.001,67.004 ; 183.679,25.094 183.679,67.004 ; 211.357,25.094 211.357,67.004 ; -4.407,25.094 246.983,25.094 246.983,67.004 -4.407,67.004 -4.407,25.094
  text "Symbol" at -2.121,64.337 h1.83
  text "Count" at 10.729,64.337 h1.83
  text "Hole Size" at 25.711,64.337 h1.83
  text "Plated" at 53.643,64.337 h1.83
  text "Hole Type" at 66.492,64.337 h1.83
  text "Drill Layer Pair" at 85.13,64.337 h1.83
  text "Via/Pad" at 123.219,64.337 h1.83
  text "Pad Shape" at 138.201,64.337 h1.83
  text "Template" at 157.144,64.337 h1.83
  text "Hole Length" at 184.822,64.337 h1.83
  text "Routed Path Length" at 212.5,64.337 h1.83
  text "3" at 10.729,60.527 h1.52
  text "5.91mil (0.150mm)" at 25.711,60.527 h1.52
  text "PTH" at 53.643,60.527 h1.52
  text "Round" at 66.492,60.527 h1.52
  text "Top Layer - Bottom Layer" at 85.13,60.527 h1.52
  text "Via" at 123.219,60.527 h1.52
  text "Rounded" at 138.201,60.527 h1.52
  text "v30h15" at 157.144,60.527 h1.52
  text "-" at 184.822,60.527 h1.52
  text "-" at 212.5,60.527 h1.52
  text "134" at 10.729,56.717 h1.52
  text "11.81mil (0.300mm)" at 25.711,56.717 h1.52
  text "PTH" at 53.643,56.717 h1.52
  text "Round" at 66.492,56.717 h1.52
  text "Top Layer - Bottom Layer" at 85.13,56.717 h1.52
  text "(Mixed)" at 123.219,56.717 h1.52
  text "Rounded" at 138.201,56.717 h1.52
  text "(Mixed)" at 157.144,56.717 h1.52
  text "-" at 184.822,56.717 h1.52
  text "-" at 212.5,56.717 h1.52
  text "2" at 10.729,52.907 h1.52
  text "23.62mil (0.600mm)" at 25.711,52.907 h1.52
  text "PTH" at 53.643,52.907 h1.52
  text "Slot" at 66.492,52.907 h1.52
  text "Top Layer - Bottom Layer" at 85.13,52.907 h1.52
  text "Pad" at 123.219,52.907 h1.52
  text "Rounded" at 138.201,52.907 h1.52
  text "r90_170h60_140r45" at 157.144,52.907 h1.52
  text "55.12mil (1.400mm)" at 184.822,52.907 h1.52
  text "31.50mil (0.800mm)" at 212.5,52.907 h1.52
  text "2" at 10.729,49.097 h1.52
  text "23.62mil (0.600mm)" at 25.711,49.097 h1.52
  text "PTH" at 53.643,49.097 h1.52
  text "Slot" at 66.492,49.097 h1.52
  text "Top Layer - Bottom Layer" at 85.13,49.097 h1.52
  text "Pad" at 123.219,49.097 h1.52
  text "Rounded" at 138.201,49.097 h1.52
  text "(Mixed)" at 157.144,49.097 h1.52
  text "66.93mil (1.700mm)" at 184.822,49.097 h1.52
  text "43.31mil (1.100mm)" at 212.5,49.097 h1.52
  text "2" at 10.729,45.287 h1.52
  text "24.41mil (0.620mm)" at 25.711,45.287 h1.52
  text "NPTH" at 53.643,45.287 h1.52
  text "Round" at 66.492,45.287 h1.52
  text "Top Layer - Bottom Layer" at 85.13,45.287 h1.52
  text "Pad" at 123.219,45.287 h1.52
  text "Rounded" at 138.201,45.287 h1.52
  text "c0hn62" at 157.144,45.287 h1.52
  text "-" at 184.822,45.287 h1.52
  text "-" at 212.5,45.287 h1.52
  text "8" at 10.729,41.477 h1.52
  text "35.43mil (0.900mm)" at 25.711,41.477 h1.52
  text "PTH" at 53.643,41.477 h1.52
  text "Round" at 66.492,41.477 h1.52
  text "Top Layer - Bottom Layer" at 85.13,41.477 h1.52
  text "Pad" at 123.219,41.477 h1.52
  text "Rounded" at 138.201,41.477 h1.52
  text "c160h90" at 157.144,41.477 h1.52
  text "-" at 184.822,41.477 h1.52
  text "-" at 212.5,41.477 h1.52
  text "8" at 10.729,37.667 h1.52
  text "39.37mil (1.000mm)" at 25.711,37.667 h1.52
  text "PTH" at 53.643,37.667 h1.52
  text "Round" at 66.492,37.667 h1.52
  text "Top Layer - Bottom Layer" at 85.13,37.667 h1.52
  text "Pad" at 123.219,37.667 h1.52
  text "Rounded" at 138.201,37.667 h1.52
  text "c180h100" at 157.144,37.667 h1.52
  text "-" at 184.822,37.667 h1.52
  text "-" at 212.5,37.667 h1.52
  text "2" at 10.729,33.857 h1.52
  text "43.31mil (1.100mm)" at 25.711,33.857 h1.52
  text "PTH" at 53.643,33.857 h1.52
  text "Round" at 66.492,33.857 h1.52
  text "Top Layer - Bottom Layer" at 85.13,33.857 h1.52
  text "Pad" at 123.219,33.857 h1.52
  text "(Mixed)" at 138.201,33.857 h1.52
  text "(Mixed)" at 157.144,33.857 h1.52
  text "-" at 184.822,33.857 h1.52
  text "-" at 212.5,33.857 h1.52
  text "4" at 10.729,30.047 h1.52
  text "82.68mil (2.100mm)" at 25.711,30.047 h1.52
  text "NPTH" at 53.643,30.047 h1.52
  text "Round" at 66.492,30.047 h1.52
  text "Top Layer - Bottom Layer" at 85.13,30.047 h1.52
  text "Pad" at 123.219,30.047 h1.52
  text "Rounded" at 138.201,30.047 h1.52
  text "c260hn210m270" at 157.144,30.047 h1.52
  text "-" at 184.822,30.047 h1.52
  text "-" at 212.5,30.047 h1.52
  text "165 Total" at 10.729,26.237 h1.52
  text "Slot definitions :" at -2.121,22.554 h1.52
  text "Routed Path Length" at 24.11,22.554 h1.52
  text "= Calculated from tool start centre position to tool end centre position." at 52.117,22.554 h1.52
  text "Hole Length" at 24.11,20.015 h1.52
  text "= Routed Path Length + Tool Size = Slot length as defined in the PCB layout" at 41.707,20.015 h1.52

## Text inside footprints (layer, text, board x,y; h text height)
J2: Bottom Overlay "Board Edge" at 31.076,-51.806 h0.71